# Altium PCB FMUM.PcbDoc (part 2 of 4)
Units mm, origin at the board's own origin, x right, y up, seen from the top; angles counter-clockwise.
Board outline 36 x 29 mm, 8 copper layers (Top Layer, GND1, Signal1, GND2, PWR1, Signal2, GND3, Bottom Layer), stack 1.01 mm thick; 117 components, 167 nets, 719 pads, 811 vias.
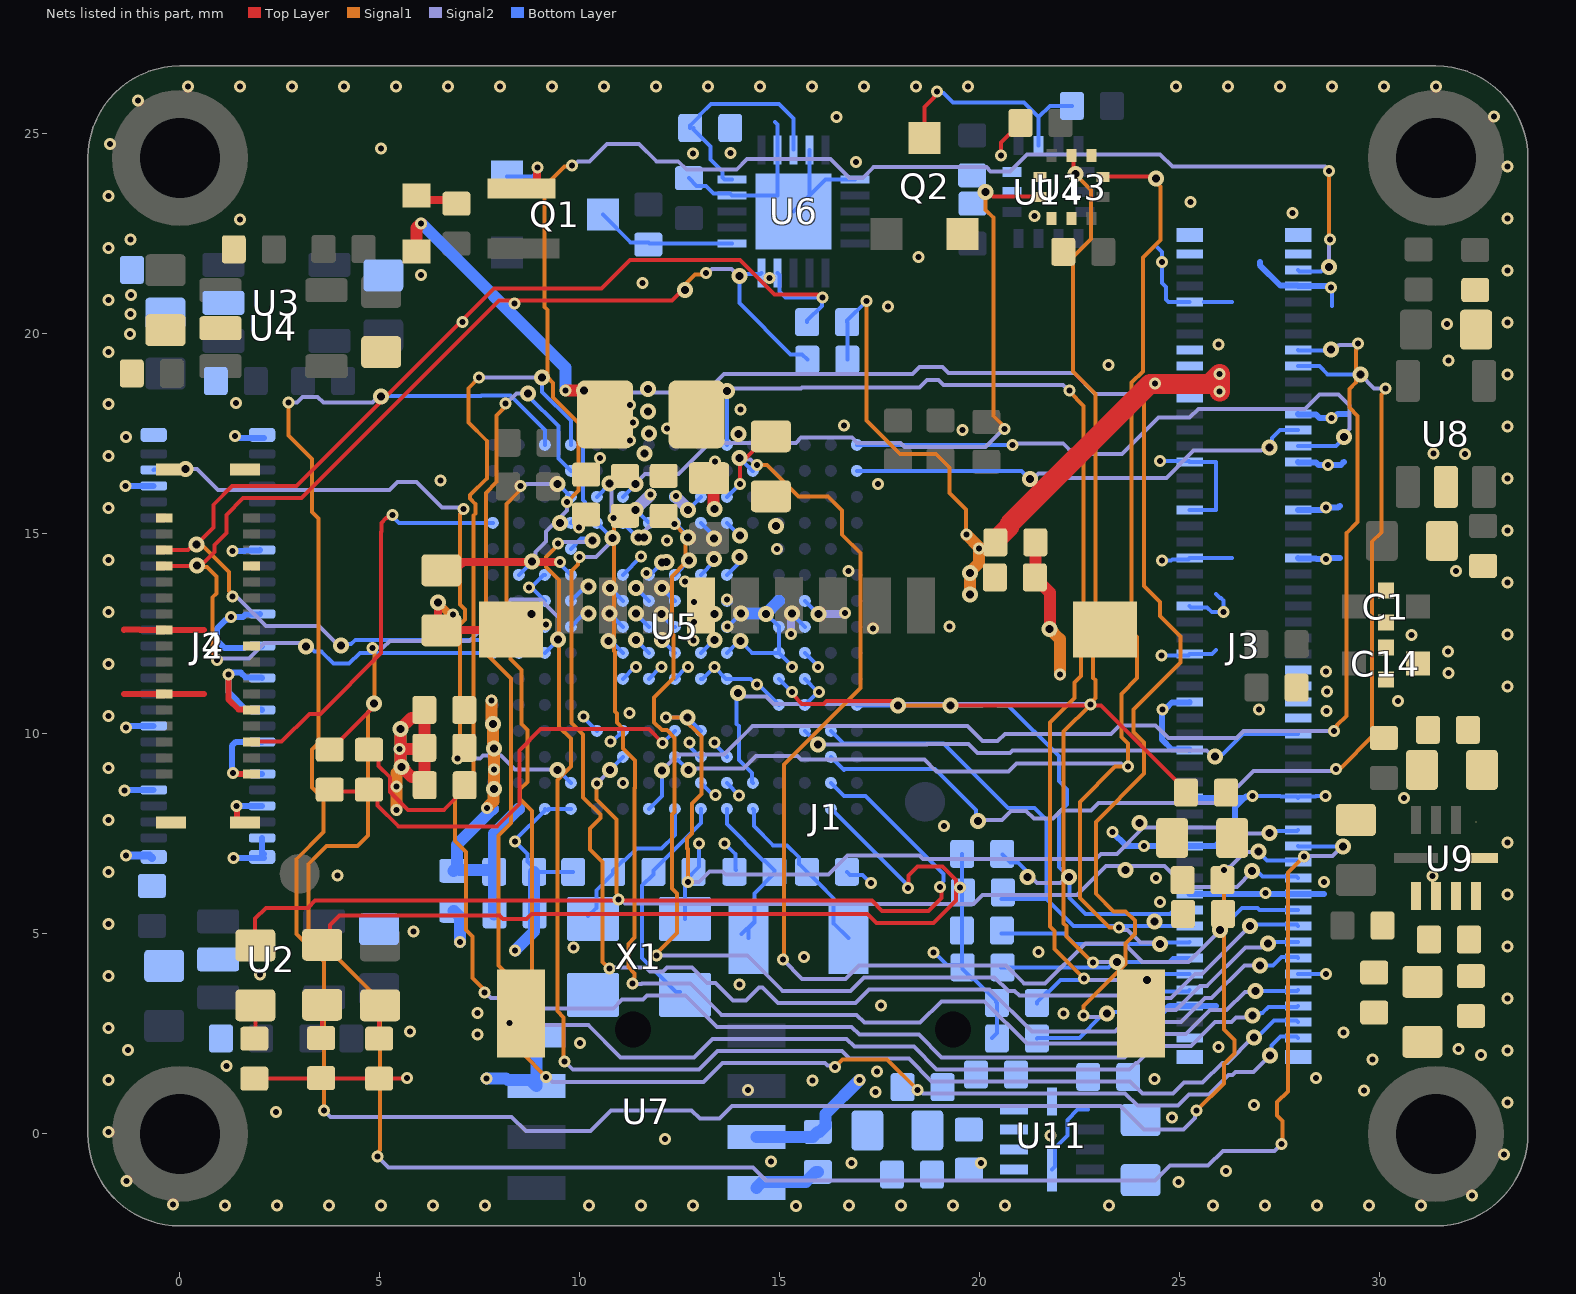
[diagram p8: the nets of this part, all layers, seen from the top]

## Via types
v1: diameter 0.3, hole 0.15, Top Layer to Bottom Layer, tented both sides, 279 vias
v2: diameter 0.3, hole 0.15, Signal1 to Signal2, tented both sides, 267 vias
v3: diameter 0.4, hole 0.2, Signal2 to Bottom Layer, tented both sides, 209 vias
v4: diameter 0.4, hole 0.2, Top Layer to Signal1, tented both sides, 54 vias
v5: diameter 0.3, hole 0.15, Top Layer to Bottom Layer, tented top, 2 vias

## Nets (pads, with @x,y where several pads share a name; then routed paths per layer and width w, separated by ;. In a path a pad name is that pad's centre, name@x,y a point inside that pad or via, vN(x,y) a via of type N, cw(c..) or ccw(c..) an arc to the next point about the centre after c; other vN are vias at no path point) (continued)
FMU_CAP1: J3.97 U5.P10 | length 35.1
  Signal1 w0.1: v2(9.683,15.796) 9.683,15.803 9.966,16.086 9.966,17.778 9.331,18.413 9.331,18.773 9.186,18.919 9.186,20.604 9.115,20.675 9.115,23.684 9.612,24.181 9.77,24.181 v2(9.803,24.214) ; v2(28.727,24.079) 28.727,22.378 v2(28.748,22.358)
  Signal2 w0.1: v3(8.798,14.315) 8.798,14.397 8.885,14.483 8.885,14.544 9.148,14.807 9.148,15.06 9.671,15.583 9.671,15.784 v2(9.683,15.796) ; v2(9.803,24.214) 9.857,24.214 9.957,24.314 10.244,24.314 10.677,24.747 11.481,24.747 11.911,24.317 12.456,24.317 12.661,24.111 13.921,24.111 14.177,24.368 16.267,24.368 16.74,23.894 17.071,23.894 17.345,24.169 20.162,24.169 20.268,24.062 20.753,24.062 21.182,24.491 24.505,24.491 24.815,24.181 28.626,24.181 v2(28.727,24.079) ; v3(28.725,21.677) 28.727,21.679 28.727,22.337 v2(28.748,22.358)
  Bottom Layer w0.1: U5.P10@8.473,13.977 8.798,14.302 v3(8.798,14.315) ; J3.97@27.955,21.6 27.99,21.565 28.532,21.565 28.644,21.677 v3(28.725,21.677)
FMU_CH1: J3.17 U5.E14 | length 30.4
  Signal1 w0.1: v2(14.426,16.723) 14.677,16.723 15.465,15.935 16.203,15.935 16.554,15.585 16.554,14.979 17.014,14.52 17.014,11.15 15.097,9.233 15.097,6.736 15.097,4.381 v2(15.072,4.356)
  Signal2 w0.1: v3(13.985,16.903) 14.022,16.865 14.267,16.865 14.41,16.723 v2(14.426,16.723) ; v2(15.072,4.356) 15.55,3.879 16.645,3.879 16.982,4.216 20.647,4.216 21.108,3.755 21.628,3.755 22.639,4.766 23.6,4.766 24.067,4.3 25.213,4.3 26,5.087 v3(26,5.1)
  Bottom Layer w0.1: v3(13.985,16.903) 13.988,16.903 14.314,16.577 U5.E14@14.323,16.577 ; v3(26,5.1) 26.551,5.651 26.937,5.651 26.989,5.6 27.945,5.6 J3.17@27.95,5.595
FMU_CH2: J3.15 U5.K12 | length 30.9
  Signal1 w0.1: v2(11.913,4.459) 11.913,4.513 12.421,5.021 12.421,6.013 12.3,6.134 12.3,6.736 12.3,7.986 12.365,8.051 12.365,9.903 12.171,10.097 12.047,10.097 11.853,10.291 11.853,10.913 12.34,11.4 12.34,12.473 12.306,12.506 12.306,13.941 12.645,14.28 12.645,14.966 v2(12.369,15.242)
  Signal2 w0.1: v3(11.463,14.909) 11.795,15.242 v2(12.369,15.242) ; v2(11.913,4.459) 14.191,4.459 15.071,3.579 16.769,3.579 17.106,3.916 20.365,3.916 20.711,3.57 20.869,3.57 20.984,3.455 23.95,3.455 24.005,3.4 24.777,3.4 25.377,4 25.547,4 26.748,5.201 v3(26.751,5.201)
  Bottom Layer w0.1: U5.K12@11.073,15.277 11.44,14.909 v3(11.463,14.909) ; v3(26.751,5.201) 26.779,5.23 27.925,5.23 J3.15@27.955,5.2
FMU_CH3: J3.13 U5.L12 | length 32
  Signal1 w0.1: v2(9.992,14.422) 9.954,14.384 9.954,14.243 9.951,14.24 9.786,14.074 9.786,10.277 10.08,9.982 10.08,8.414 10.511,7.983 10.511,7.9 10.247,7.636 10.247,7.112 10.561,6.797 10.561,6.736 10.561,4.297 10.72,4.138 v2(10.735,4.138)
  Signal2 w0.1: v2@9.999,14.424 10.4,14.424 10.816,14.84 v3(10.816,14.899) ; v2(10.735,4.138) 10.753,4.156 11.649,4.156 11.747,4.059 12.078,4.059 12.176,4.156 12.8,4.156 13.181,3.775 13.385,3.775 13.826,3.334 14.157,3.334 14.483,3.66 14.565,3.66 14.946,3.279 16.893,3.279 17.23,3.616 20.241,3.616 21.302,2.555 23.381,2.555 23.926,3.1 24.901,3.1 25.501,3.7 25.671,3.7 26.637,4.666 26.992,4.666 27.027,4.666 27.12,4.759 v3(27.201,4.759)
  Bottom Layer w0.1: U5.L12@10.423,15.277 10.428,15.277 10.805,14.899 v3(10.816,14.899) ; v3(27.201,4.759) 27.242,4.8 J3.13@27.955,4.8
FMU_CH4: J3.11 U5.L13 | length 32
  Signal1 w0.1: v2(10.839,15.397) 10.849,15.387 10.849,12.073 10.878,12.043 10.878,10.558 10.922,10.514 10.922,10.287 11.08,10.129 11.08,9.636 11.377,9.339 11.377,8.651 11.369,8.643 11.369,6.736 11.369,4.905 11.213,4.749 11.213,4.169 11.369,4.012 11.369,3.915 11.347,3.892 11.347,3.795 v2(11.308,3.756)
  Signal2 w0.1: v3(10.741,16.259) 10.794,16.207 10.794,15.555 10.801,15.548 10.801,15.435 v2(10.839,15.397) ; v2(11.308,3.756) 11.318,3.746 11.543,3.746 11.555,3.759 12.765,3.759 13.545,2.979 16.919,2.979 17.114,2.783 18.506,2.783 19.039,3.316 20.117,3.316 21.178,2.255 23.528,2.255 24.072,2.8 25.026,2.8 25.626,3.4 25.795,3.4 26.612,4.216 v3(26.998,4.216)
  Bottom Layer w0.1: U5.L13@10.423,15.927 10.741,16.245 v3(10.741,16.259) ; v3(26.998,4.216) 27.33,4.216 27.534,4.42 27.935,4.42 J3.11@27.955,4.4
FMU_CH5: J3.7 U5.M15 | length 41.9
  Signal1 w0.1: v2(7.481,18.907) 7.216,18.642 7.216,17.785 7.671,17.329 7.671,16.391 7.25,15.97 7.25,15.887 7.384,15.753 7.384,15.504 7.341,15.462 7.341,8.829 6.881,8.37 6.881,7.318 7.152,7.048 7.152,6.736 7.152,5.102 7.317,4.937 7.317,3.893 7.616,3.594 v2(7.616,3.54)
  Signal2 w0.1: v2(7.481,18.907) 7.486,18.912 v3(9.047,18.912) ; v2(7.616,3.54) 7.631,3.54 7.774,3.397 8.131,3.397 8.39,3.139 10.835,3.139 11.052,3.356 11.577,3.356 11.68,3.459 12.641,3.459 13.421,2.679 16.795,2.679 16.99,2.483 18.472,2.483 19.039,1.916 23.613,1.916 23.785,2.088 23.81,2.088 24.221,2.5 25.15,2.5 25.75,3.1 26.169,3.1 26.622,3.553 26.87,3.553 v3(26.894,3.576)
  Bottom Layer w0.1: v3(9.047,18.912) 9.056,18.903 9.056,18.547 9.773,17.83 U5.M15@9.773,17.227 ; v3(26.894,3.576) 27.931,3.576 J3.7@27.955,3.6
FMU_CH6: J3.5 U5.M14 | length 40.6
  Signal1 w0.1: v2(8.141,18.257) 8.141,18.203 8.063,18.126 8.063,18.11 7.917,17.964 7.917,16.294 7.651,16.029 7.651,12.009 8.272,11.388 8.272,7.772 7.963,7.463 7.963,6.736 7.963,4.214 8.405,3.771 8.405,2.928 8.246,2.769 v2(8.236,2.769)
  Signal2 w0.1: v2(8.141,18.257) 8.158,18.257 8.409,18.509 8.704,18.509 v3(8.706,18.511) ; v2(8.236,2.769) 8.274,2.731 8.388,2.731 8.401,2.718 10.209,2.718 11.018,1.909 12.848,1.909 13.318,2.379 16.67,2.379 16.866,2.183 18.348,2.183 18.915,1.616 23.737,1.616 23.9,1.779 23.936,1.779 24.357,2.2 25.274,2.2 25.874,2.8 26.294,2.8 26.404,2.91 26.764,2.91 v3(26.813,2.959)
  Bottom Layer w0.1: v3(8.706,18.511) 8.706,18.452 9.462,17.696 9.462,16.887 U5.M14@9.773,16.577 ; v3(26.813,2.959) 26.871,3.016 27.009,3.016 27.022,3.029 27.064,3.029 27.21,3.175 27.93,3.175 J3.5@27.955,3.2
FMU_CH7: J3.3 U5.M11 | length 35
  Signal1 w0.1: v2(9.45,14.766) 9.45,14.728 9.148,14.426 9.148,14.177 9.482,13.844 9.482,10.178 9.774,9.886 9.774,9.189 9.434,8.849 9.434,6.736 9.434,3.073 9.593,2.914 9.593,1.837 v2(9.617,1.813)
  Signal2 w0.1: v2(9.45,14.766) 9.475,14.792 10.273,14.792 v3(10.32,14.839) ; v2(9.617,1.813) 9.821,1.609 12.973,1.609 13.443,2.079 16.546,2.079 16.742,1.883 18.223,1.883 18.791,1.316 23.754,1.316 24.061,1.009 24.828,1.009 25.1,1.281 25.565,1.281 26.061,1.777 26.188,1.777 26.82,2.409 v3(26.852,2.409)
  Bottom Layer w0.1: U5.M11@9.773,14.627 10.028,14.883 10.275,14.883 v3(10.32,14.839) ; v3(26.852,2.409) 26.922,2.409 27.347,2.835 27.92,2.835 J3.3@27.955,2.8
FMU_CH8: J3.1 U5.M13 | length 37.6
  Signal1 w0.1: v2(8.518,16.203) 8.48,16.165 8.48,16.067 8.164,15.751 8.164,12.409 8.269,12.304 8.269,11.872 8.538,11.603 8.538,10.253 8.687,10.104 8.687,8.798 8.506,8.618 8.506,8.369 8.801,8.075 8.801,6.736 8.801,4.014 8.705,3.918 8.705,2.681 8.562,2.538 8.562,2.024 v2(9.158,1.428) ; v2(16.38,1.679) 16.56,1.858 17.683,1.858 v2(18.445,1.095)
  Signal2 w0.1: v2@8.518,16.211 8.548,16.242 8.667,16.242 8.677,16.252 v3(9.434,16.252) ; v2(9.158,1.428) 9.184,1.428 9.316,1.296 13.084,1.296 13.567,1.779 16.121,1.779 16.189,1.711 16.348,1.711 v2(16.38,1.679) ; v2(18.445,1.095) 18.5,1.095 18.579,1.016 23.63,1.016 23.937,0.709 24.952,0.709 25.224,0.981 25.722,0.981 26.218,1.477 26.312,1.477 26.385,1.55 26.839,1.55 27.247,1.958 v3(27.253,1.959)
  Bottom Layer w0.1: v3(9.434,16.252) 9.448,16.252 U5.M13@9.773,15.927 ; v3(27.253,1.959) 27.293,1.999 27.293,2.214 27.514,2.435 27.92,2.435 J3.1@27.955,2.4
FMU_nRST: J3.87 U5.J1 | length 30.6
  Signal1 w0.1: v2(28.853,10.068) 28.853,10.122 28.926,10.195 28.926,10.219 29.159,10.452 29.159,15.017 29.441,15.299 29.441,17.951 29.236,18.156 29.236,18.626 29.396,18.785 29.396,19.598 29.413,19.615 29.413,19.718 v2(29.451,19.757)
  Signal2 w0.1: v3@12.053,9.088 12.454,9.489 13.006,9.489 13.012,9.483 13.605,9.483 14.32,10.199 18.465,10.199 19.688,10.199 20.069,9.819 20.441,9.819 20.626,10.003 23.278,10.003 23.492,10.216 24.395,10.216 24.716,9.894 26.42,9.894 26.594,10.068 v2(28.853,10.068) ; v3(28.776,19.607) 28.857,19.607 28.956,19.706 28.972,19.706 28.984,19.718 29.292,19.718 ; 29.293,19.718 29.413,19.718 v2(29.451,19.757)
  Bottom Layer w0.1: U5.J1@11.723,8.127 12.048,8.452 v3(12.048,9.088) ; J3.87@27.955,19.6 27.963,19.592 28.76,19.592 v3(28.776,19.607)
FMU_nSAFETY_SWITCH_LED_OUT: J3.23 U5.N15 | length 57.8
  Signal1 w0.1: v2(2.713,18.283) 2.713,17.461 3.3,16.874 3.3,15.548 3.467,15.382 3.467,9.777 3.298,9.608 3.298,8.666 3.588,8.376 3.588,7.545 2.909,6.867 2.909,5.001 3.607,4.304 v2(3.607,0.584) ; v2(25.419,0.581) 26.1,1.262 26.1,1.748 26.363,2.011 26.363,2.343 26.1,2.606 v2(26.1,6.6)
  Signal2 w0.1: v2(2.713,18.283) 2.719,18.289 2.932,18.289 3.07,18.428 3.443,18.428 3.588,18.283 4.816,18.283 4.966,18.433 v3(5.024,18.433) ; v2(3.607,0.584) 3.766,0.425 8.293,0.425 8.648,0.07 10.262,0.07 10.781,0.589 12.795,0.589 12.996,0.388 13.494,0.388 13.802,0.695 23.51,0.695 23.558,0.647 23.56,0.647 24.101,0.106 25.086,0.106 25.381,0.401 25.381,0.543 v2(25.419,0.581) ; v2(26.1,6.6) 26.154,6.6 26.228,6.674 26.25,6.674 26.624,7.048 26.949,7.048 v3(26.966,7.065)
  Bottom Layer w0.1: v3(5.024,18.433) 5.04,18.448 7.529,18.448 7.536,18.455 8.267,18.455 9.123,17.6 U5.N15@9.123,17.227 ; v3(26.966,7.065) 26.966,7.048 27.179,6.835 27.92,6.835 J3.23@27.955,6.8
FMU_PPM_INPUT: J3.39 U5.C4 | length 12.9
  Signal2 w0.1: v3(15.95,9.74) 18.677,9.74 18.683,9.746 19.71,9.746 19.937,9.519 20.749,9.519 20.812,9.582 25.671,9.582 25.818,9.435 v3(25.879,9.435)
  Bottom Layer w0.1: U5.C4@15.623,10.077 15.95,9.75 v3(15.95,9.74) ; v3(25.879,9.435) 25.936,9.492 26.071,9.492 26.579,10 J3.39@27.955,10
FMU_SAFETY_SWITCH_IN: J3.21 U5.K3 | length 22
  Signal1 w0.1: v2(10.425,8.758) 10.416,8.749 10.416,8.361 10.916,7.86 10.916,6.736 10.916,6.017 10.931,6.003 10.931,5.897 v2(10.969,5.859)
  Signal2 w0.1: v2(10.425,8.758) 10.425,8.766 10.746,9.086 v3(10.746,9.102) ; v2(10.969,5.859) 11.023,5.859 11.123,5.759 12.451,5.759 12.461,5.749 19.835,5.749 20.061,5.975 22.43,5.975 23.155,6.7 24.615,6.7 25.138,6.177 26.421,6.177 26.799,6.555 v3(26.799,6.578)
  Bottom Layer w0.1: v3(10.746,9.102) 10.748,9.102 U5.K3@11.073,9.427 ; v3(26.799,6.578) 26.856,6.521 26.979,6.521 27.066,6.435 27.92,6.435 J3.21@27.955,6.4
FMU_SWCLK: J3.77 U5.A14 | length 11.8
  Signal2 w0.1: v3(21.251,16.377) 21.326,16.377 21.46,16.511 21.95,16.511 22.059,16.402 24.661,16.402 25.341,17.082 27.032,17.082 27.053,17.103 27.183,17.103 v3(27.24,17.161)
  Bottom Layer w0.1: U5.A14@16.923,16.577 18.465,16.577 21.043,16.577 21.242,16.377 v3(21.251,16.377) ; v3(27.24,17.161) 27.298,17.218 27.298,17.394 27.504,17.6 J3.77@27.955,17.6
FMU_SWDIO: J3.75 U5.A15 | length 15.3
  Signal2 w0.1: v1(20.814,17.227) 20.844,17.257 22.083,17.257 22.339,17.002 23.557,17.002 24.462,17.907 25.245,17.907 25.464,18.126 28.126,18.126 28.486,18.485 28.969,18.485 29.241,18.213 29.241,17.627 29.101,17.487 v3(29.101,17.418)
  Bottom Layer w0.1: U5.A15@16.923,17.227 v1@20.813,17.227 ; J3.75@27.955,17.2 28.907,17.2 29.101,17.394 v3(29.101,17.418)
FMU_VDD_3V3: C21.2 C22.2 C23.2 C25.2 C28.2 C36.2 C37.2 C40.2 C41.2 C42.2 C43.2 C45.2 C49.2 D1.2 FB2.2 FB3.1 J3.84 J3.86 R22.2 R23.2 R25.2 R26.2 R27.2 R28.2 R29.2 R30.2 R37.1 R38.1 R40.1 R41.1 U5.C5 U5.C6 U5.C7 U5.C8 U5.C9 U5.F3 U5.G3 U5.G13 U5.H13 U5.J12 U5.J13 U5.K4 U5.N8 U5.N9 U5.N10 U7.3 U7.7 U7.8 | length 58.7
  Top Layer w0.1: R40.1@1.86,1.381 R37.1@4.978,1.381 5.659,1.381 v1(5.678,1.4) ; R41.1@4.727,9.605 4.964,9.367 4.964,9.199 5.247,8.917 5.247,8.553 5.7,8.1 6.596,8.1 7.126,8.63 C43.2@7.126,8.678
  Top Layer w0.3: D1.2@5.913,22.057 5.913,22.648 v1(6.03,22.764) ; v1(9.638,18.581) 10.085,18.581 10.633,18.033 C21.2@10.633,17.989
  Top Layer w0.5: C25.2@20.386,14.789 20.386,14.839 20.436,14.889 20.443,14.889 20.736,15.182 20.736,15.24 24.246,18.75 25.736,18.75 v1(25.989,19.004) ; v1(25.992,18.558) 26,18.565 v1@26,19
  Signal1 w0.1: v2(7.673,8.151) v2@7.711,8.189 ; v1(17.166,20.826) 17.166,17.834 18,17 18.9,17 19.242,16.658 19.242,16.021 19.651,15.613 19.651,15.001 v2(19.671,14.981)
  Signal1 w0.3: v2@7.711,8.189 7.836,8.313 7.836,8.603 v4(7.85,8.618) 7.854,8.622 v2(7.854,9.113) 7.849,9.118 v4(7.849,9.641) 7.849,9.668 7.829,9.688 v4(7.829,10.243) ; v2(7.787,10.832) 7.787,10.213 v4@7.8,10.2 ; v2@19.671,14.976 19.974,14.672 v2(19.974,14.642) 19.974,14.27 19.755,14.051 v4(19.755,14.023) v4(19.755,13.484)
  Signal2 w0.1: v3(8.784,13.002) 9.008,12.778 v2@9.122,12.778
  Signal2 w0.2: v2(15.271,12.501) v3@15.271,12.971 ; v3(15.961,13.002) 16.578,13.002 16.58,13.003 16.597,13.003 v2@16.6,13
  Signal2 w0.3: v3@11.385,15.602 v2(11.77,15.987) ; v2@12.406,15.928 12.406,15.921 12.7,15.627 v3(12.7,15.6)
  Bottom Layer w0.1: v1(8.732,13.665) v1@8.774,13.665 ; v3(8.784,13.002) 8.79,13.002 9.115,12.677 U5.N8@9.123,12.677 ; v1@8.81,13.64 U5.N9@9.123,13.327 ; v1@8.81,13.689 8.81,13.665 v1@8.774,13.665 ; U5.N10@9.123,13.977 9.085,13.977 v1@8.774,13.665 ; v1(10.77,9.804) 10.801,9.804 U5.K4@11.073,10.077 ; v3(11.384,15.602) 11.386,15.604 11.416,15.604 v3@11.435,15.622 ; U5.J12@11.723,15.277 11.723,15.279 11.435,15.566 v3@11.435,15.622 ; U5.J13@11.723,15.927 11.723,15.91 v3@11.435,15.622 ; U5.H13@12.373,15.927 v3(12.7,15.6) ; v3(12.7,15.6) 13.023,15.923 U5.G13@13.023,15.927 ; v1(12.736,9.789) 12.774,9.751 12.774,9.645 12.993,9.427 U5.G3@13.023,9.427 ; v1(13.361,9.783) 13.361,9.753 13.673,9.441 U5.F3@13.673,9.427 ; v3(15.301,13.005) 15.301,12.999 U5.C8@15.623,12.677 ; U5.C5@15.623,10.727 v1@15.95,11.054 ; U5.C6@15.623,11.377 15.945,11.054 v1@15.95,11.054 ; U5.C7@15.623,12.027 15.953,11.696 v1(15.953,11.667) ; U5.C9@15.623,13.327 15.948,13.002 v3(15.961,13.002) ; v1(15.971,11.054) v1@15.95,11.054 ; R30.2@16.68,20.295 16.684,20.29 R29.2@16.684,19.36 ; R30.2@16.68,20.331 v1@17.166,20.817 ; v1@18.9,4.5 19.177,4.223 19.507,4.223 R25.2@19.568,4.163 ; R25.2@19.556,4.244 19.556,6.039 R22.2@19.556,7.002 ; R25.2@19.568,4.126 19.816,3.878 19.853,3.878 20.17,3.56 20.178,3.56 20.4,3.339 R27.2@20.4,3.3 ; R28.2@20.3,2.4 20.427,2.527 R27.2@20.427,3.276
  Bottom Layer w0.3: v1(6.03,22.764) 9.638,19.156 v1(9.638,18.581) ; FB3.1@6.835,5.579 6.85,5.579 7,5.429 v1(7,4.8) ; v1(7.67,1.384) 8.158,1.384 8.198,1.344 8.759,1.344 U7.7@8.909,1.194 U7.8@8.909,2.464 ; U7.3@14.409,-0.076 15.821,-0.076 C49.2@15.949,0.051 ; C49.2@15.991,0.051 16.141,0.201 16.141,0.501 v1(16.989,1.349)
  other v1: 17.395,1.054 17.428,1.558 18.839,4.54
  other v2: 24.5,5.8 24.4,6.4 24.1,7.2 9.158,12.739 16.626,13.023 12.406,15.952 11.257,17.338 12.172,17.636 11.323,17.788 11.257,18.224
  other v4: 24.366,5.315 23.64,6.602 23.988,7.772 11.617,17.011 11.727,17.507 11.7,18.066 11.704,18.622
FMU_VDD_5V: C14.3 C15.2 C16.2 C17.2 C29.2 U9.1 U11.1 U11.5 | length 2
  Bottom Layer w0.1: U11.5@21.802,-0.894 21.877,-0.819 21.877,-0.351 22.188,-0.04 22.188,0.354 22.441,0.606 U11.1@22.702,0.606
  other v1: 24.798,0.409 24.369,1.373 31.719,11.519 31.707,12.061
GND: BT1.2 C1.2 C2.1 C5.1 C6.1 C7.1 C11.1 C12.1 C13.1 C14.2 C15.1 C16.1 C17.1 C18.1 C19.1 C20.1 C21.1 C22.1 C23.1 C24.1 C25.1 C26.2 C27.1 C28.1 C29.1 C30.1 C31.1 C33.1 C35.1 C36.1 C37.1 C38.1 C39.1 C40.1 C41.1 C42.1 C43.1 C44.1 C45.1 C46.1 C47.1 C48.1 C49.1 C50.1 C51.1 C52.1 C53.1 J1.6 J1.MP1 J1.MP2 J1.MP3 J1.MP4 J2.1 J2.8 J2.15 J2.18 J2.23 J2.26 J2.34 J2.M1 J2.M2 J2.M3 J2.M4 J3.2 J3.6 J3.9 J3.19 J3.20 J3.26 J3.31 J3.32 J3.38 J3.41 J3.43 J3.44 J3.45 J3.47 J3.50 J3.56 J3.61 J3.62 J3.67 J3.68 J3.73 J3.74 J3.79 J3.82 J3.88 J3.94 J3.95 J3.99 J3.100 J3.M1 J3.M2 J3.M3 J3.M4 J4.1 J4.5 J4.8 J4.9 J4.13 J4.16 J4.17 J4.21 J4.25 J4.29 J4.37 J4.46 J4.M1 J4.M2 J4.M3 J4.M4 Q1.2 Q2.2 R1.2 R2.2 R3.2 R6.1 R7.2 R9.2 R10.1 R11.1 R13.1 R15.1 R17.1 R19.1 R20.1 R24.1 U2.2 U3.2 U4.2 U5.D5 U5.D7 U5.D8 U5.D9 U5.F2 U5.F6 U5.F7 U5.F8 U5.F9 U5.F10 U5.F12 U5.G2 U5.G6 U5.G7 U5.G8 U5.G9 U5.G10 U5.G12 U5.H6 U5.H7 U5.H8 U5.H9 U5.H10 U5.H12 U5.J6 U5.J7 U5.J8 U5.J9 U5.J10 U5.K6 U5.K7 U5.K8 U5.K9 U5.K10 U5.L4 U5.M1 U5.M8 U5.M9 U5.N1 U6.1 U6.14 U6.17 U6.19 U6.21 U7.4 U8.2 U9.10 U11.10 U13.3 U13.6 U13.8 U13.9 U14.6 U14.7 X1.2 X1.4 | length 108.8
  Top Layer w0.1: v1(20.524,24.463) 20.524,24.783 20.729,24.988 20.766,24.988 21.014,25.237 C50.1@21.014,25.273
  Top Layer w0.15: -1.4,11 0.6,11 ; -1.4,12.6 -1.392,12.608 -1,12.608 -0.992,12.6 0.6,12.6 ; v1(1.219,11.481) 1.219,10.857 1.466,10.61 1.78,10.61 J2.26@1.79,10.6 ; v1@1.4,9 J2.34@1.79,9 ; v1(1.417,8.192) 1.427,8.183 1.427,7.865 1.492,7.8 J2.M4@1.6,7.8
  Top Layer w0.2: v4(6.447,13.289) 6.447,12.853 C27.1@6.6,12.7 ; C27.1@6.534,12.589 6.545,12.6 J1.MP1@8.3,12.6 ; BT1.2@8.5,23.7 8.839,23.7 8.927,23.788 8.927,24.142 v1(8.941,24.155)
  Top Layer w0.3: v1(5.491,9.629) v1@5.512,9.629 ; C45.1@6.108,9.653 6.084,9.629 v1@5.512,9.629 ; C40.1@6.11,10.599 C40.1@6.11,10.549 ; C43.1@6.12,8.718 6.12,8.768 C43.1@6.11,8.779 ; C2.1@13.229,16.392 13.34,16.282 13.34,15.674 13.36,15.654 v4(13.36,15.627) ; C25.1@21.386,14.789 21.386,13.927 C41.1@21.372,13.914 21.75,13.536 21.75,12.629 v4(21.745,12.624) ; v1@5.512,9.629 v4(5.512,10.126) 5.786,10.399 5.96,10.399 C40.1@6.11,10.549 ; v1@5.512,9.629 5.512,9.229 5.539,9.202 v4(5.539,9.175) 5.796,8.918 5.97,8.918 C43.1@6.11,8.779 ; C43.1@6.11,8.779 C40.1@6.11,10.549
  Signal1 w0.2: v4(6.447,13.289) 6.73,13.006 6.794,13.006 v2@6.8,13
  Signal1 w0.3: v2(5.414,8.101) 5.414,8.679 v2(5.409,8.684) 5.409,9.018 5.539,9.148 v4(5.539,9.175) 5.539,9.202 5.512,9.229 v4(5.512,10.126) ; v4(21.745,12.624) 21.999,12.369 v2(21.999,11.486)
  Bottom Layer w0.1: Q1.2@8.173,23.937 8.818,23.937 8.903,24.022 8.903,24.063 8.94,24.1 v1@9,24.1 ; C44.1@8.8,6.7 8.686,6.814 8.686,6.995 v1(8.376,7.305) 8.376,7.343 9.123,8.09 U5.N1@9.123,8.127 ; C44.1@8.857,6.553 8.862,6.547 C39.1@9.832,6.547 ; U5.N1@9.2,8.1 9.2,8.111 9.215,8.127 U5.M1@9.773,8.127 ; U5.M8@9.773,12.677 10.043,12.947 10.161,12.947 v3(10.219,13.004) ; U5.M9@9.773,13.327 10.136,13.69 v3(10.211,13.69) ; v1(10.086,10.431) 10.086,10.414 U5.L4@10.423,10.077 ; v3(10.719,12.319) 10.78,12.319 U5.K7@11.073,12.027 ; v3(10.744,13.005) U5.K8@11.073,12.677 ; v3(10.748,13.652) U5.K9@11.073,13.327 ; U5.K6@11.073,11.377 11.363,11.667 v1(11.405,11.667) ; U5.K10@11.073,13.977 11.532,14.436 v1(11.532,14.438) ; v3(11.398,13.015) 11.398,13.002 U5.J8@11.723,12.677 ; v3(11.398,13.652) U5.J9@11.723,13.327 ; v3(11.404,12.344) 11.721,12.027 U5.J7@11.723,12.027 ; U5.J6@11.723,11.377 12.013,11.667 v1(12.04,11.667) ; U5.J10@11.723,13.977 11.747,13.977 12.048,14.277 v3(12.048,14.288) ; v3(12.034,13.002) 12.034,12.984 12.342,12.677 U5.H8@12.373,12.677 ; v3(12.048,13.652) U5.H9@12.373,13.327 ; v3(12.057,12.349) 12.057,12.342 U5.H7@12.373,12.027 ; U5.H6@12.373,11.377 12.663,11.667 v1(12.7,11.667) ; U5.H10@12.373,13.977 v3(12.727,14.331) ; U5.H12@12.373,15.277 12.696,14.952 v3(12.696,14.906) ; X1.4@12.626,5.377 12.626,6.326 12.979,6.679 v1(12.979,7.264) ; C47.1@12.725,23.893 12.919,23.7 13.15,23.7 13.337,23.514 13.753,23.514 U6.14@13.803,23.464 14.941,23.464 U6.17@14.941,24.602 14.941,25.241 14.882,25.3 ; U5.G2@13.023,8.777 13.286,8.513 13.352,8.513 v1(13.39,8.475) ; U5.G6@13.023,11.377 13.07,11.377 v1(13.36,11.667) 13.651,11.377 U5.F6@13.673,11.377 14.262,11.377 14.408,11.231 v1(14.421,11.231) 14.468,11.231 U5.D5@14.973,10.727 ; U5.G7@13.023,12.027 13.348,12.352 v3(13.361,12.352) ; U5.G8@13.023,12.677 13.032,12.677 13.357,13.002 v3(13.361,13.002) ; U5.G10@13.023,13.977 13.353,14.307 v3(13.353,14.372) ; U5.G12@13.023,15.277 13.355,14.944 v3(13.355,14.88) ; v1(13.613,7.266) 13.883,6.996 13.883,6.617 C19.1@13.9,6.6 ; U5.F2@13.673,8.777 13.673,8.767 v1(13.977,8.463) ; U5.F7@13.673,12.027 13.971,12.325 v3(14.01,12.325) 14.308,12.027 U5.D7@14.973,12.027 ; U5.F8@13.673,12.677 13.711,12.715 13.731,12.715 v3(14.021,13.005) ; U5.F10@13.673,13.977 13.936,14.24 13.936,14.367 v3(13.993,14.425) ; U5.F12@13.673,15.277 13.99,14.959 v3(14.003,14.959) ; v3(14.658,12.998) 14.973,12.683 U5.D8@14.973,12.677 U5.D7@14.973,12.027 ; v1(15.297,11.667) 15.297,11.703 U5.D7@14.973,12.027 ; U6.21@15.341,23.064 U6.21@15.741,23.464 ; U6.19@15.741,24.602 U6.21@15.741,23.464 ; C20.1@16.676,6.554 16.752,6.478 17.065,6.478 v1(17.273,6.27) ; U6.1@16.879,23.864 16.141,23.864 U6.21@15.741,23.464 ; 24.4,22.2 24.551,22.049 v1(24.551,21.795) 24.551,21.273 24.654,21.169 24.654,20.859 24.712,20.8 J3.94@25.245,20.8 ; v1(24.504,16.821) 25.224,16.821 J3.74@25.245,16.8 25.9,16.8 25.9,15.6 J3.68@25.245,15.6 ; v1(24.543,11.964) 24.81,11.964 24.811,11.965 25.21,11.965 J3.50@25.245,12 25.8,12 25.9,12.1 ; v1(24.546,14.334) 24.781,14.334 24.811,14.365 25.21,14.365 J3.62@25.245,14.4 26.3,14.4 ; J3.56@25.245,13.2 25.28,13.165 25.679,13.165 25.802,13.042 v1(26.084,13.042) 26.084,13.341 26.025,13.4 26,13.4 25.9,13.5 ; 25.6,20.8 26.3,20.8 ; v1(26.816,8.45) 27.507,8.45 27.521,8.435 27.92,8.435 J3.31@27.955,8.4 27.99,8.435 28.389,8.435 28.396,8.443 v1(28.644,8.443) ; J3.9@27.955,4 27.959,3.996 v1(28.651,3.996) ; v1(28.773,21.162) 28.8,21.136 28.8,20.7
  Bottom Layer w0.15: v1@-1.4,8.6 J4.8@-0.655,8.6 ; v1@-1.4,16.2 J4.46@-0.655,16.2 ; v1@-1.3,10.2 -1.289,10.189 -1.283,10.189 -1.272,10.2 J4.16@-0.655,10.2 ; v1(1.313,14.573) 1.628,14.573 1.645,14.59 1.99,14.59 J4.37@2,14.6 ; v1(1.339,6.9) J4.M1@2.1,6.9 ; v1(1.372,17.45) 1.412,17.45 1.462,17.4 J4.M3@2.1,17.4 ; v1@1.5,8.2 J4.5@2.055,8.2 ; J4.29@2,13 1.99,12.99 1.645,12.99 1.583,12.928 v1(1.275,12.928) 1.235,12.928 1.16,12.853 1.149,12.853 0.922,12.627 0.922,12.342 1.113,12.151 1.606,12.151 1.645,12.19 2.045,12.19 J4.25@2.055,12.2 ; J4.1@2.055,7.4 2.055,7 J4.M1@2.1,7 ; J4.9@2.055,9 1.3,9 1.3,9.7 1.4,9.8 J4.13@2.055,9.8 ; J4.17@2.055,10.6 2.045,10.61 1.645,10.61 1.431,10.824 1.431,10.828 1.219,11.04 v1(1.219,11.481) 1.26,11.481 1.311,11.532 1.523,11.532 1.645,11.41 2.045,11.41 J4.21@2.055,11.4 ; v1(23.311,7.543) 23.654,7.2 J3.26@25.245,7.2 25.9,7.2 26.377,7.677 26.377,8.162 26.614,8.4 ; 24.565,3.028 24.737,3.2 J3.6@25.245,3.2 25.9,3.2 ; J3.20@25.245,6 27.066,6 27.095,6.029 v1(27.135,6.029) 27.176,6.029 27.205,6 J3.19@27.955,6 28.6,6 ; J3.32@25.245,8.4 26.614,8.4 ; J3.38@25.245,9.6 25.235,9.61 24.801,9.61 24.553,9.858 24.553,10.609 v1(24.56,10.616) 24.589,10.645 24.656,10.645 24.801,10.79 25.235,10.79 J3.44@25.245,10.8 ; v1(26.816,8.45) 26.807,8.44 26.655,8.44 26.614,8.4 ; 27,21.8 27,21.721 27.511,21.21 27.945,21.21 J3.95@27.955,21.2 28.695,21.2 28.733,21.162 v1(28.773,21.162) ; J3.61@27.955,14.4 27.965,14.39 28.399,14.39 28.411,14.378 v1(28.647,14.378) 28.669,14.4 29,14.4 ; J3.67@27.955,15.6 28.552,15.6 28.607,15.654 v1(28.647,15.654) 28.954,15.654 29,15.7 ; J3.73@27.955,16.8 27.965,16.79 28.399,16.79 28.461,16.727 v1(28.702,16.727) 29.027,16.727 29.1,16.8 ; J3.79@27.955,18 27.965,17.99 28.399,17.99 28.495,17.894 v1(28.795,17.894) 28.835,17.894 28.941,18 29.2,18
  Bottom Layer w0.2: v1(-1.344,6.966) -0.766,6.966 J4.M2@-0.7,6.9
  Bottom Layer w0.3: v1@8.384,4.592 8.857,5.064 C46.1@8.857,5.488 ; C44.1@8.857,6.553 8.857,5.499 C46.1@8.867,5.488 ; v3(14.021,13.005) 14.651,13.005 v3(14.658,12.998) 14.658,13.011 U5.D9@14.973,13.327 ; U7.4@14.409,-1.346 14.555,-1.2 15.648,-1.2 15.899,-0.949 C49.1@15.949,-0.949
  other v1: 1.121,-1.787 2.421,-1.787 3.721,-1.787 5.021,-1.787 6.321,-1.787 7.621,-1.787 10.221,-1.787 11.521,-1.787 12.821,-1.787 15.4,-1.8 16.721,-1.787 18.021,-1.787 19.321,-1.787 20.621,-1.787 23.221,-1.787 25.821,-1.787 27.121,-1.787 28.421,-1.787 29.721,-1.787 31.021,-1.787 -0.179,-1.769 32.297,-1.537 24.962,-1.204 -1.336,-1.176 16.792,-0.728 14.783,-0.684 33.102,-0.517 12.124,-0.13 21.767,-0.037 -1.787,0.043 2.405,0.551 33.187,0.78 29.598,1.086 -1.787,1.343 15.812,1.337 28.4,1.4 1.165,1.698 32.532,1.973 33.187,2.08 -1.3,2.1 25.963,2.177 10.008,2.276 7.436,2.486 29.094,2.536 5.749,2.562 -1.787,2.643 7.439,3.02 22.096,3.005 17.521,3.208 33.187,3.38 13.992,3.734 -1.787,3.943 2.007,3.988 8.383,4.59 33.187,4.68 5.842,5.055 -1.787,5.243 33.187,5.98 28.607,6.299 3.938,6.461 -1.787,6.543 33.187,7.28 19.108,7.7 -1.787,7.843 -1.389,8.584 1.322,9.023 -1.787,9.143 -1.353,10.16 -1.787,10.443 28.659,10.578 30.448,10.825 28.674,11.063 33.187,11.18 28.649,11.564 -1.787,11.743 30.785,12.471 33.187,12.48 19.234,12.689 -1.787,13.043 33.187,13.78 31.902,14.072 -1.787,14.343 33.187,15.08 -1.787,15.643 -1.357,16.202 17.45,16.247 6.518,16.336 33.187,16.38 -1.787,16.943 32.131,16.993 31.336,17.015 -1.351,17.427 33.187,17.68 -1.787,18.243 1.4,18.27 33.187,18.98 23.209,19.217 31.715,19.335 -1.787,19.543 25.965,19.741 -1.246,19.994 31.673,20.251 33.187,20.28 -1.241,20.502 17.699,20.685 -1.787,20.843 -1.22,20.967 11.56,21.275 6.025,21.47 33.187,21.58 18.458,21.92 -1.787,22.143 -1.231,22.364 1.497,22.858 33.187,22.88 21.371,22.943 27.819,23.017 25.271,23.3 -1.787,23.443 33.187,24.18 16.906,24.294 12.827,24.511 13.762,24.518 -1.753,24.743 16.418,25.422 32.85,25.436 -1.052,25.837 0.2,26.187 1.5,26.187 2.8,26.187 4.1,26.187 5.4,26.187 6.7,26.187 8,26.187 9.3,26.187 10.6,26.187 11.9,26.187 13.2,26.187 14.5,26.187 15.8,26.187 17.1,26.187 18.4,26.187 19.7,26.187 24.9,26.187 26.2,26.187 27.5,26.187 28.8,26.187 30.1,26.187 31.4,26.187
  other v2: 26.153,-0.93 20.029,-0.728 26.847,0.727 14.205,1.101 29.813,1.858 31.968,2.126 15.601,4.421 21.462,4.545 9.836,4.655 19.5,6.165 31.314,6.448 30.6,8.4 11.077,8.775 11.245,10.523 26.981,10.613 12.843,12.339 17.331,12.639 13.693,12.684 12.852,12.793 6.826,12.987 12.852,13.298 13.68,13.365 12.624,13.812 11.664,14.028 16.714,14.073 14.93,14.618 12.171,14.833 9.976,15.163 13.381,16.813 10.5,16.9 19.558,17.599 16.603,17.711 14.012,18.11 7.061,20.297 8.36,20.755 14.742,21.4 5.031,24.635
  other v4: 12.17,14.3 11.603,14.907 14.9,15.2 9.506,15.27 13.961,17.497
HEATER: J2.30 U5.R12 | length 10.4
  Top Layer w0.1: J2.30@1.79,9.8 1.801,9.811 2.545,9.811 3.236,10.503 3.51,10.503 5.029,12.022 5.029,15.048 5.037,15.056 5.037,15.277 5.156,15.396 5.182,15.396 5.254,15.468 v1(5.308,15.468)
  Bottom Layer w0.1: v1(5.308,15.468) 5.308,15.44 5.471,15.277 U5.R12@7.823,15.277
HW_REV_SENSE: R41.2 R42.1 U5.H4 | length 11.3
  Top Layer w0.1: R42.1@3.611,8.559 R41.2@4.727,8.559 ; R41.2@4.727,8.605 4.938,8.394 4.938,8.213 5.46,7.692 6,7.692 7.925,7.692 8.485,8.252 8.485,9.585 9.019,10.119 11.725,10.119 v1(12.065,9.779)
  Bottom Layer w0.1: v1(12.065,9.779) 12.075,9.779 U5.H4@12.373,10.077
HW_VER_REV_DRIVE: J3.25 R42.2 U5.N7 | length 55.6
  Top Layer w0.1: R42.2@3.745,9.607 3.781,9.607 4.045,9.87 4.045,9.875 4.743,10.573 4.743,10.575 4.848,10.681 v4(4.848,10.762)
  Signal1 w0.1: v2(4.813,12.146) 4.813,12.091 4.862,12.042 4.862,10.776 v4(4.848,10.762) 4.848,10.697 4.705,10.553 4.705,7.464 4.443,7.203 3.67,7.203 3.209,6.743 3.209,5.126 5,3.335 5,-0.406 4.981,-0.425 4.981,-0.526 v2(4.943,-0.565) ; v2(27.535,-0.253) 27.569,-0.219 27.569,0.327 27.431,0.465 27.431,0.796 27.7,1.066 27.7,6.531 v2(28.101,6.932)
  Signal2 w0.1: v2(4.813,12.146) 4.825,12.158 5.079,12.158 5.248,12.327 6,12.327 7.239,12.327 8.278,13.365 9.009,13.365 9.478,12.896 9.478,12.396 v3(9.448,12.365) ; v2(4.943,-0.565) 5.219,-0.841 14.327,-0.841 14.652,-1.166 24.382,-1.166 24.754,-0.794 25.706,-0.794 26.075,-0.425 27.363,-0.425 v2(27.535,-0.253) ; v2(28.101,6.932) 28.115,6.946 28.815,6.946 29.059,7.19 v3(29.079,7.19)
  Bottom Layer w0.1: U5.N7@9.123,12.027 9.448,12.352 v3(9.448,12.365) ; J3.25@27.955,7.2 27.965,7.19 v3(29.079,7.19)
HW_VER_SENSE: J3.27 U5.G4 | length 21.9
  Signal1 w0.1: v2(12.153,10.415) 12.557,10.415 13.036,9.936 13.036,8.497 12.8,8.261 12.8,7.509 12.679,7.389 12.679,7.14 12.7,7.12 12.7,6.736 v2(12.7,6.3)
  Signal2 w0.1: v2(12.153,10.415) v3(12.693,10.415) ; v2(12.7,6.3) 12.976,6.3 13.235,6.559 13.566,6.559 13.642,6.483 16.211,6.483 16.464,6.736 16.694,6.966 18.465,6.966 18.485,6.966 18.573,6.877 22.908,6.877 23.03,7 23.421,7 24.076,7.655 26.526,7.655 26.665,7.515 27.222,7.515 v3(27.235,7.528)
  Bottom Layer w0.1: v3(12.693,10.415) 12.693,10.406 U5.G4@13.023,10.077 ; v3(27.235,7.528) 27.284,7.577 27.932,7.577 J3.27@27.955,7.6
I2C1_SCL_BASE_GPS1_MAG_LED_PM1: J3.18 R22.1 U5.A5 | length 14.7
  Signal2 w0.1: v3(21.191,6.427) 21.273,6.427 21.379,6.32 21.425,6.275 22.016,6.275 22.166,6.425 v3(22.224,6.425)
  Bottom Layer w0.1: U5.A5@16.923,10.727 16.933,10.716 20.058,10.716 20.061,10.719 20.434,10.719 20.436,10.716 20.705,10.716 21.971,9.45 21.971,8.818 22.175,8.614 22.175,8.241 21.971,8.037 21.971,6.678 v3(22.224,6.425) 22.242,6.407 22.242,5.901 22.643,5.5 24.746,5.5 24.811,5.565 24.965,5.565 25,5.6 J3.18@25.245,5.6 ; R22.1@20.568,6.981 20.762,6.787 20.947,6.787 21.134,6.6 21.134,6.485 v3(21.191,6.427)
I2C1_SDA_BASE_GPS1_MAG_LED_PM1: J3.16 R23.1 U5.B4 | length 13.3
  Bottom Layer w0.1: U5.B4@16.273,10.077 16.594,9.755 19.091,9.755 20.701,8.146 21.37,8.146 21.666,7.85 21.666,5.877 ; R23.1@20.538,5.877 21.666,5.877 ; J3.16@25.245,5.2 22.344,5.2 21.666,5.877
I2C2_DRDY1_BMP388: U5.K13 U13.7 | length 18
  Top Layer w0.1: v4(20.143,23.549) 20.224,23.549 20.332,23.441 21.488,23.441 U13.7@21.506,23.423
  Signal1 w0.1: v4(20.143,23.549) 20.143,23.103 20.342,22.904 20.342,17.95 20.579,17.712 20.579,17.661 v2(20.619,17.621)
  Signal2 w0.1: v3(11.384,16.252) 11.384,16.261 11.623,16.5 12.467,16.5 13.172,17.205 13.392,17.205 13.463,17.276 15.403,17.276 15.532,17.405 16.802,17.405 16.931,17.276 18.016,17.276 18.12,17.172 18.161,17.172 18.465,17.172 20.136,17.172 20.586,17.621 v2(20.619,17.621)
  Bottom Layer w0.1: U5.K13@11.073,15.927 11.384,16.238 v3(11.384,16.252)
I2C2_SCL_BASE_GPS2_MAG_LED_PM2: J3.14 R26.1 U5.H3 U13.2 | length 39.9
  Top Layer w0.1: U13.2@23.081,23.923 23.089,23.931 24.348,23.931 v4(24.399,23.88)
  Signal1 w0.1: v2(23.475,5.166) 23.466,5.158 23.242,5.158 22.5,5.9 22.5,8.3 23.382,9.182 v2@23.631,9.182 ; v2@23.67,9.144 v2@23.631,9.182 ; v2(23.708,9.182) 23.67,9.182 v2@23.631,9.182 ; v4(24.399,23.88) 24.399,23.799 24.513,23.685 24.513,22.347 24.072,21.907 24.072,19.063 23.79,18.78 23.79,12.561 23.928,12.423 23.928,11.394 23.538,11.003 23.538,9.928 23.708,9.758 23.708,9.259 v2@23.631,9.182
  Signal2 w0.1: v3(12.709,9.099) 12.745,9.136 14.091,9.136 14.407,9.452 15.443,9.452 15.531,9.363 18.465,9.363 18.611,9.363 18.908,9.065 20.719,9.065 20.915,9.261 23.521,9.261 23.562,9.22 23.67,9.22 v2(23.708,9.182) ; v2(23.475,5.166) 23.529,5.166 23.595,5.1 23.691,5.1 24.01,4.781 24.466,4.781 v3(24.498,4.75)
  Bottom Layer w0.1: U5.H3@12.373,9.427 12.381,9.427 v3(12.709,9.099) ; R26.1@20.542,5.013 22.107,5.013 22.367,4.752 23.615,4.752 23.617,4.75 v3(24.498,4.75) 24.529,4.781 25.226,4.781 J3.14@25.245,4.8
I2C2_SDA_BASE_GPS2_MAG_LED_PM2: J3.12 R25.1 U5.E2 U13.4 | length 38.3
  Top Layer w0.1: U13.4@22.293,24.46 22.335,24.418 22.335,24.134 22.393,24.076 v4(22.393,23.995)
  Signal1 w0.1: v4(22.393,23.995) 22.393,23.982 22.772,23.603 22.772,22.376 22.324,21.928 22.324,19.059 22.89,18.493 22.89,12.105 22.828,12.044 22.828,11.401 22.884,11.345 22.884,10.897 22.764,10.777 22.764,10.726 22.094,10.057 22.094,5.262 22.162,5.195 22.162,4.933 22.813,4.282 v2(22.824,4.282)
  Signal2 w0.1: v3(13.956,11.027) 14.037,11.027 14.132,10.931 14.656,10.931 14.836,10.752 18.465,10.752 22.751,10.752 v2(22.764,10.739) ; v2(22.824,4.282) 22.835,4.293 23.419,4.293 v3(23.428,4.302)
  Bottom Layer w0.1: v3(13.956,11.027) 13.919,10.99 13.919,10.254 13.973,10.201 13.973,9.352 14.298,9.027 14.298,8.802 U5.E2@14.323,8.777 ; R25.1@20.525,4.166 23.22,4.166 23.356,4.302 v3(23.428,4.302) 23.43,4.3 24.722,4.3 24.824,4.402 25.243,4.402 J3.12@25.245,4.4
I2C3_SCL_EXTERNAL1: J3.10 R27.1 U5.F15 | length 31.5
  Signal1 w0.1: v2(22.235,18.583) 22.235,18.558 22.589,18.204 22.589,12.228 22.528,12.168 22.528,11.45 22.364,11.285 22.364,10.9 21.746,10.282 21.746,5.186 21.862,5.071 21.862,4.628 v2(22.606,3.884)
  Signal2 w0.1: v3(13.673,18.575) 13.73,18.632 13.872,18.632 13.881,18.641 15.525,18.641 15.548,18.664 15.796,18.664 15.8,18.66 18.465,18.66 18.492,18.66 18.675,18.844 18.967,18.844 19.086,18.725 22.076,18.725 22.218,18.583 v2(22.235,18.583) ; v2(22.606,3.884) 22.638,3.852 23.615,3.852 23.708,3.946 24.003,3.946 24.099,3.85 v3(24.18,3.85)
  Bottom Layer w0.1: U5.F15@13.673,17.227 v3(13.673,18.575) ; R27.1@21.429,3.261 21.429,3.298 21.677,3.546 21.714,3.546 22.018,3.85 v3(24.18,3.85) 24.243,3.85 24.393,4 J3.10@25.245,4
I2C3_SDA_EXTERNAL1: J3.8 R28.1 U5.M12 | length 41.9
  Signal1 w0.1: v2(22.592,2.955) 22.592,3.194 23.641,4.243 23.641,4.766 23.875,5.001 23.875,5.332 23.641,5.566 23.338,5.566 22.9,6.004 22.9,7.8 24.108,9.008 24.108,9.783 23.838,10.052 23.838,10.606 25.016,11.784 25.016,12.432 24.5,12.948 24.5,13.3 24.099,13.701 24.099,18.489 v2(24.371,18.76)
  Signal2 w0.1: v3(10.102,18.589) 10.121,18.607 10.394,18.607 10.467,18.534 13.138,18.534 13.596,18.993 18.309,18.993 18.316,19 18.49,19.174 19.069,19.174 19.219,19.025 22.358,19.025 22.883,18.5 24.111,18.5 v2(24.371,18.76) ; v2(22.592,2.955) 22.627,2.921 23.013,2.921 23.098,3.005 v3(23.179,3.005)
  Bottom Layer w0.1: U5.M12@9.773,15.277 9.773,15.285 10.13,15.642 10.13,15.795 10.082,15.843 10.082,18.568 v3(10.102,18.589) ; R28.1@21.424,2.386 21.439,2.4 22.485,2.4 23.033,2.948 23.122,2.948 23.22,3.047 24.017,3.047 24.536,3.565 25.21,3.565 J3.8@25.245,3.6
I2C4_SCL_FMU: J2.7 R29.1 U5.R7 U6.10 | length 31.7
  Top Layer w0.1: J2.7@-0.39,14.2 0.361,14.2 v4@0.397,14.236 ; v4(0.426,14.207) 0.507,14.207 0.586,14.286 0.601,14.286 0.865,14.549 0.865,14.719 1.164,15.018 1.164,15.478 1.58,15.893 3.037,15.893 6,18.856 6.144,19 7.98,20.836 12.3,20.836 12.564,21.1 v4(12.626,21.1)
  Signal1 w0.1: v4(0.426,14.207) 0.465,14.169 0.683,14.169 0.916,13.935 0.916,13.514 0.808,13.406 0.808,12.004 0.929,11.884 v2(0.929,11.846) ; v4(12.626,21.1) 12.665,21.14 12.665,21.268 12.88,21.483 13.113,21.483 v2(13.151,21.521)
  Signal2 w0.1: v2(0.929,11.846) 0.964,11.881 1.724,11.881 2.114,12.272 2.99,12.272 3.077,12.185 v3(3.158,12.185) ; v2(13.151,21.521) 13.205,21.521 13.305,21.621 13.785,21.621 13.963,21.443 v3(13.993,21.443)
  Bottom Layer w0.1: v3(3.158,12.185) 3.239,12.185 3.362,12.062 3.533,12.062 3.84,11.755 4.227,11.755 4.499,12.027 6,12.027 U5.R7@7.823,12.027 ; v3@13.993,21.43 14.056,21.493 14.508,21.493 U6.10@14.541,21.526 ; v3(13.993,21.443) 13.993,20.767 15.269,19.491 15.553,19.491 R29.1@15.684,19.36
I2C4_SDA_FMU: J2.5 R30.1 U5.P7 U6.9 | length 32.2
  Top Layer w0.1: J2.5@-0.39,14.6 0.206,14.6 0.342,14.736 v4(0.415,14.736) 0.837,15.158 0.837,15.729 1.301,16.193 2.913,16.193 7.856,21.136 10.54,21.136 11.247,21.844 14.001,21.844 14.864,20.981 15.944,20.981 16.016,20.909 v1(16.07,20.909)
  Signal1 w0.1: v4(0.415,14.736) 0.472,14.678 0.598,14.678 1.23,14.047 1.23,13.571 1.309,13.492 v2(1.309,13.438)
  Signal2 w0.1: v2(1.309,13.438) 1.347,13.4 1.451,13.4 2.157,12.694 3.481,12.694 3.963,12.212 v3(4.025,12.212)
  Bottom Layer w0.1: v3(4.025,12.212) 4.063,12.249 4.283,12.249 4.388,12.354 8.145,12.354 U5.P7@8.473,12.027 ; U6.9@14.941,21.526 14.991,21.476 14.991,21.06 15.138,20.913 15.545,20.913 15.978,20.913 15.982,20.909 v1(16.07,20.909) 16.052,20.89 16.052,20.703 15.68,20.331 R30.1@15.68,20.295
nARMED: J3.85 U5.B3 | length 26.6
  Signal1 w0.1: v2(28.9,9.127) 28.938,9.166 29.04,9.166 29.805,9.931 29.805,14.805 30.041,15.041 30.041,18.485 30.141,18.585 v2(30.141,18.64)
  Signal2 w0.1: v3(19.952,7.827) 19.972,7.846 20.552,7.846 20.783,8.077 21.156,8.077 21.347,7.887 21.829,7.887 22.024,8.082 22.782,8.082 22.969,8.269 26.032,8.269 26.838,9.075 28.794,9.075 28.846,9.127 v2(28.9,9.127) ; v3(29.51,18.99) 29.51,18.983 29.853,18.64 v2(30.141,18.64)
  Bottom Layer w0.1: U5.B3@16.273,9.427 16.598,9.102 16.623,9.127 18.465,9.127 18.872,9.127 19.906,8.092 19.906,7.873 v3(19.952,7.827) ; J3.85@27.955,19.2 28.486,19.2 28.696,18.99 v3(29.51,18.99)
NetC18_2: C18.2 C38.2 FB2.1 R8.2 U11.6 U11.7 U11.8
NetC19_2: C19.2 U5.F1 Y1.1 | length 4.4
  Bottom Layer w0.1: U5.F1@13.673,8.127 13.673,7.746 14.58,6.839 14.616,6.839 14.864,6.591 C19.2@14.864,6.554 14.864,6.518 14.362,6.015 14.362,5.289 14.212,5.14 Y1.1@14.212,4.898 ; Y1.1@14.04,4.995 Y1.1@14.333,5.289
NetC20_2: C20.2 U5.E1 Y1.2 | length 4.4
  Bottom Layer w0.1: U5.E1@14.323,8.127 14.346,8.103 14.346,7.701 14.833,7.214 15.18,7.214 15.483,6.911 15.483,6.858 15.483,6.752 15.966,6.27 16.346,5.89 16.346,5.265 Y1.2@16.712,4.898
NetC24_2: C24.2 U5.G1 X1.1 | length 5.7
  Bottom Layer w0.1: C24.2@11.836,6.547 C24.2@11.836,6.584 ; X1.1@12.504,3.546 12.407,3.546 11.907,4.045 11.907,4.052 11.557,4.402 11.557,6.205 11.836,6.484 C24.2@11.836,6.584 ; U5.G1@13.023,8.127 13.023,7.771 12.11,6.858 C24.2@11.836,6.584
NetC26_1: C26.1 U5.F13 | length 2
  Top Layer w0.1: v1(13.998,16.252) 13.998,16.75 14.689,17.442 C26.1@14.773,17.442
  Bottom Layer w0.1: U5.F13@13.673,15.927 v1(13.998,16.252)
NetC27_2: C27.2 U5.M10 | length 3.5
  Top Layer w0.2: C27.2@6.652,13.865 6.652,13.887 6.938,14.174 6.96,14.174 7.088,14.302 v1(9.497,14.3) v1(9.497,14.3)
  Bottom Layer w0.1: v1(9.497,14.3) 9.497,14.253 U5.M10@9.773,13.977
NetC30_2: C30.2 C31.2 FB1.1 R5.2 U9.6 U9.7 U9.8
NetC39_2: C39.2 U5.H1 X1.3 | length 4
  Bottom Layer w0.1: X1.3@10.204,5.446 10.408,5.65 10.408,6.087 10.832,6.511 10.832,6.584 11.08,6.832 11.117,6.832 11.143,6.858 11.423,7.138 12.044,7.138 12.373,7.467 U5.H1@12.373,8.127
NetC44_2: C44.2 C46.2 FB3.2 U5.P1 U5.R1 | length 5.7
  Bottom Layer w0.3: FB3.2@6.835,6.579 6.921,6.665 6.921,6.736 6.921,7.225 U5.R1@7.823,8.127 ; FB3.2@6.985,6.596 7.814,6.596 C44.2@7.857,6.553 ; C46.2@7.857,5.488 C44.2@7.857,6.553 ; U5.P1@8.473,8.127 7.857,7.51 C44.2@7.857,6.553
NetC48_2: C48.2 U6.15 U6.18 | length 5.6
  Bottom Layer w0.1: C48.2@12.758,25.149 12.758,25.212 13.008,25.462 13.008,25.48 13.279,25.751 14.977,25.751 15.336,25.391 U6.18@15.336,24.607 ; C48.2@12.835,25.146 12.835,25.11 13.099,24.846 13.106,24.846 13.269,24.683 13.269,24.355 13.569,24.055 13.569,23.914 13.619,23.864 U6.15@13.803,23.864
NetD1_1: D1.1 R21.1 | length 1.1
  Top Layer w0.2: D1.1@6.035,23.477 6.159,23.353 6.897,23.353 R21.1@7,23.25
NetD2_A: D2.A R37.2 | length 0.8
  Top Layer w0.1: R37.2@4.978,2.381 4.978,3.188 D2.A@5.004,3.214
NetD3_A: D3.A R38.2 | length 0.8
  Top Layer w0.1: R38.2@3.53,2.396 3.555,2.422 D3.A@3.555,3.229
NetD4_A: D4.A R40.2 | length 0.8
  Top Layer w0.1: R40.2@1.86,2.381 1.886,2.407 D4.A@1.886,3.214
NetQ1_3: Q1.3 R31.1 U6.11 | length 3.5
  Bottom Layer w0.1: Q1.3@10.573,22.987 11.268,22.292 11.712,22.292 11.74,22.264 U6.11@13.803,22.264
NetQ2_3: Q2.3 R39.1 U14.9 | length 5.8
  Top Layer w0.1: Q2.3@18.618,24.892 18.618,25.671 18.856,25.909 18.856,25.941 18.925,26.01 v1(18.925,26.064)
  Bottom Layer w0.1: v1(18.925,26.064) 18.963,26.026 19.093,26.026 19.332,25.787 21.099,25.787 21.468,25.418 ; U14.9@21.468,24.71 21.468,25.418 ; R39.1@22.3,25.7 21.749,25.7 21.468,25.418
NetR5_1: R5.1 R6.2 U9.9
NetR8_1: R8.1 R10.2 U11.9
NetR24_2: R24.2 U5.D6 | length 11.5
  Top Layer w0.1: v1(15.301,11.052) 15.301,11.009 15.556,10.754 16.095,10.754 16.17,10.829 17.835,10.829 v4(17.948,10.716) ; v4(19.263,10.712) 23.027,10.712 25.154,8.585 R24.2@25.154,8.534
  Signal1 w0.1: v4(17.948,10.716) 19.262,10.716 19.263,10.715 v4(19.263,10.712)
  Bottom Layer w0.1: U5.D6@14.973,11.377 15.298,11.052 v1(15.301,11.052)
NFC_GPIO: J4.48 U5.M2 | length 17.9
  Signal1 w0.1: v2(6.934,9.388) 6.934,9.442 7.002,9.51 7.002,12.74 7.126,12.863 7.126,13.112 7.002,13.235 7.002,15.493 7.084,15.575 v2(7.084,15.629)
  Signal2 w0.1: v3(0.141,16.627) 0.145,16.623 0.432,16.623 0.955,16.1 5.243,16.1 5.44,16.297 5.91,16.297 6,16.207 6.55,15.658 7.055,15.658 v2(7.084,15.629) ; v2(6.934,9.388) 7.508,9.388 7.577,9.457 8.026,9.457 8.376,9.106 v3@9.434,9.106
  Bottom Layer w0.1: J4.48@-0.655,16.6 -0.651,16.604 0.118,16.604 v3(0.141,16.627) ; v3(9.434,9.102) 9.448,9.102 U5.M2@9.773,8.777
nLED_BLUE: D4.K U5.B2 | length 22.7
  Top Layer w0.1: D4.K@1.883,4.717 1.883,5.383 2.151,5.651 3.197,5.651 3.377,5.83 17.298,5.83 17.553,5.576 18.71,5.576 19.037,5.903 19.037,6.139 v1(18.999,6.177)
  Bottom Layer w0.1: U5.B2@16.273,8.777 16.598,8.452 17.136,8.452 18.465,7.123 19.086,6.502 19.086,6.318 18.999,6.231 v1(18.999,6.177)
nLED_GREEN: D3.K U5.B1 | length 21.8
  Top Layer w0.1: D3.K@3.555,4.729 3.748,4.922 3.748,5.22 3.988,5.46 7.989,5.46 8.075,5.374 8.66,5.374 8.786,5.5 17.187,5.5 17.412,5.276 18.835,5.276 19.399,5.84 19.399,6.351 19.07,6.68 18.441,6.68 18.217,6.456 18.217,6.168 v1(18.199,6.149)
  Bottom Layer w0.1: U5.B1@16.273,8.127 16.286,8.127 17.676,6.736 18.16,6.252 18.16,6.187 v1(18.199,6.149)